# Altium PCB Car_wash_machine.PcbDoc (part 4 of 6)
Units mm, origin at the board's own origin, x right, y up, seen from the top; angles counter-clockwise.
Board outline 229.74 x 149.86 mm, 2 copper layers (Top Layer, Bottom Layer); 256 components, 170 nets, 868 pads, 731 vias.
Unrouted connection lines stored in the file: 362.
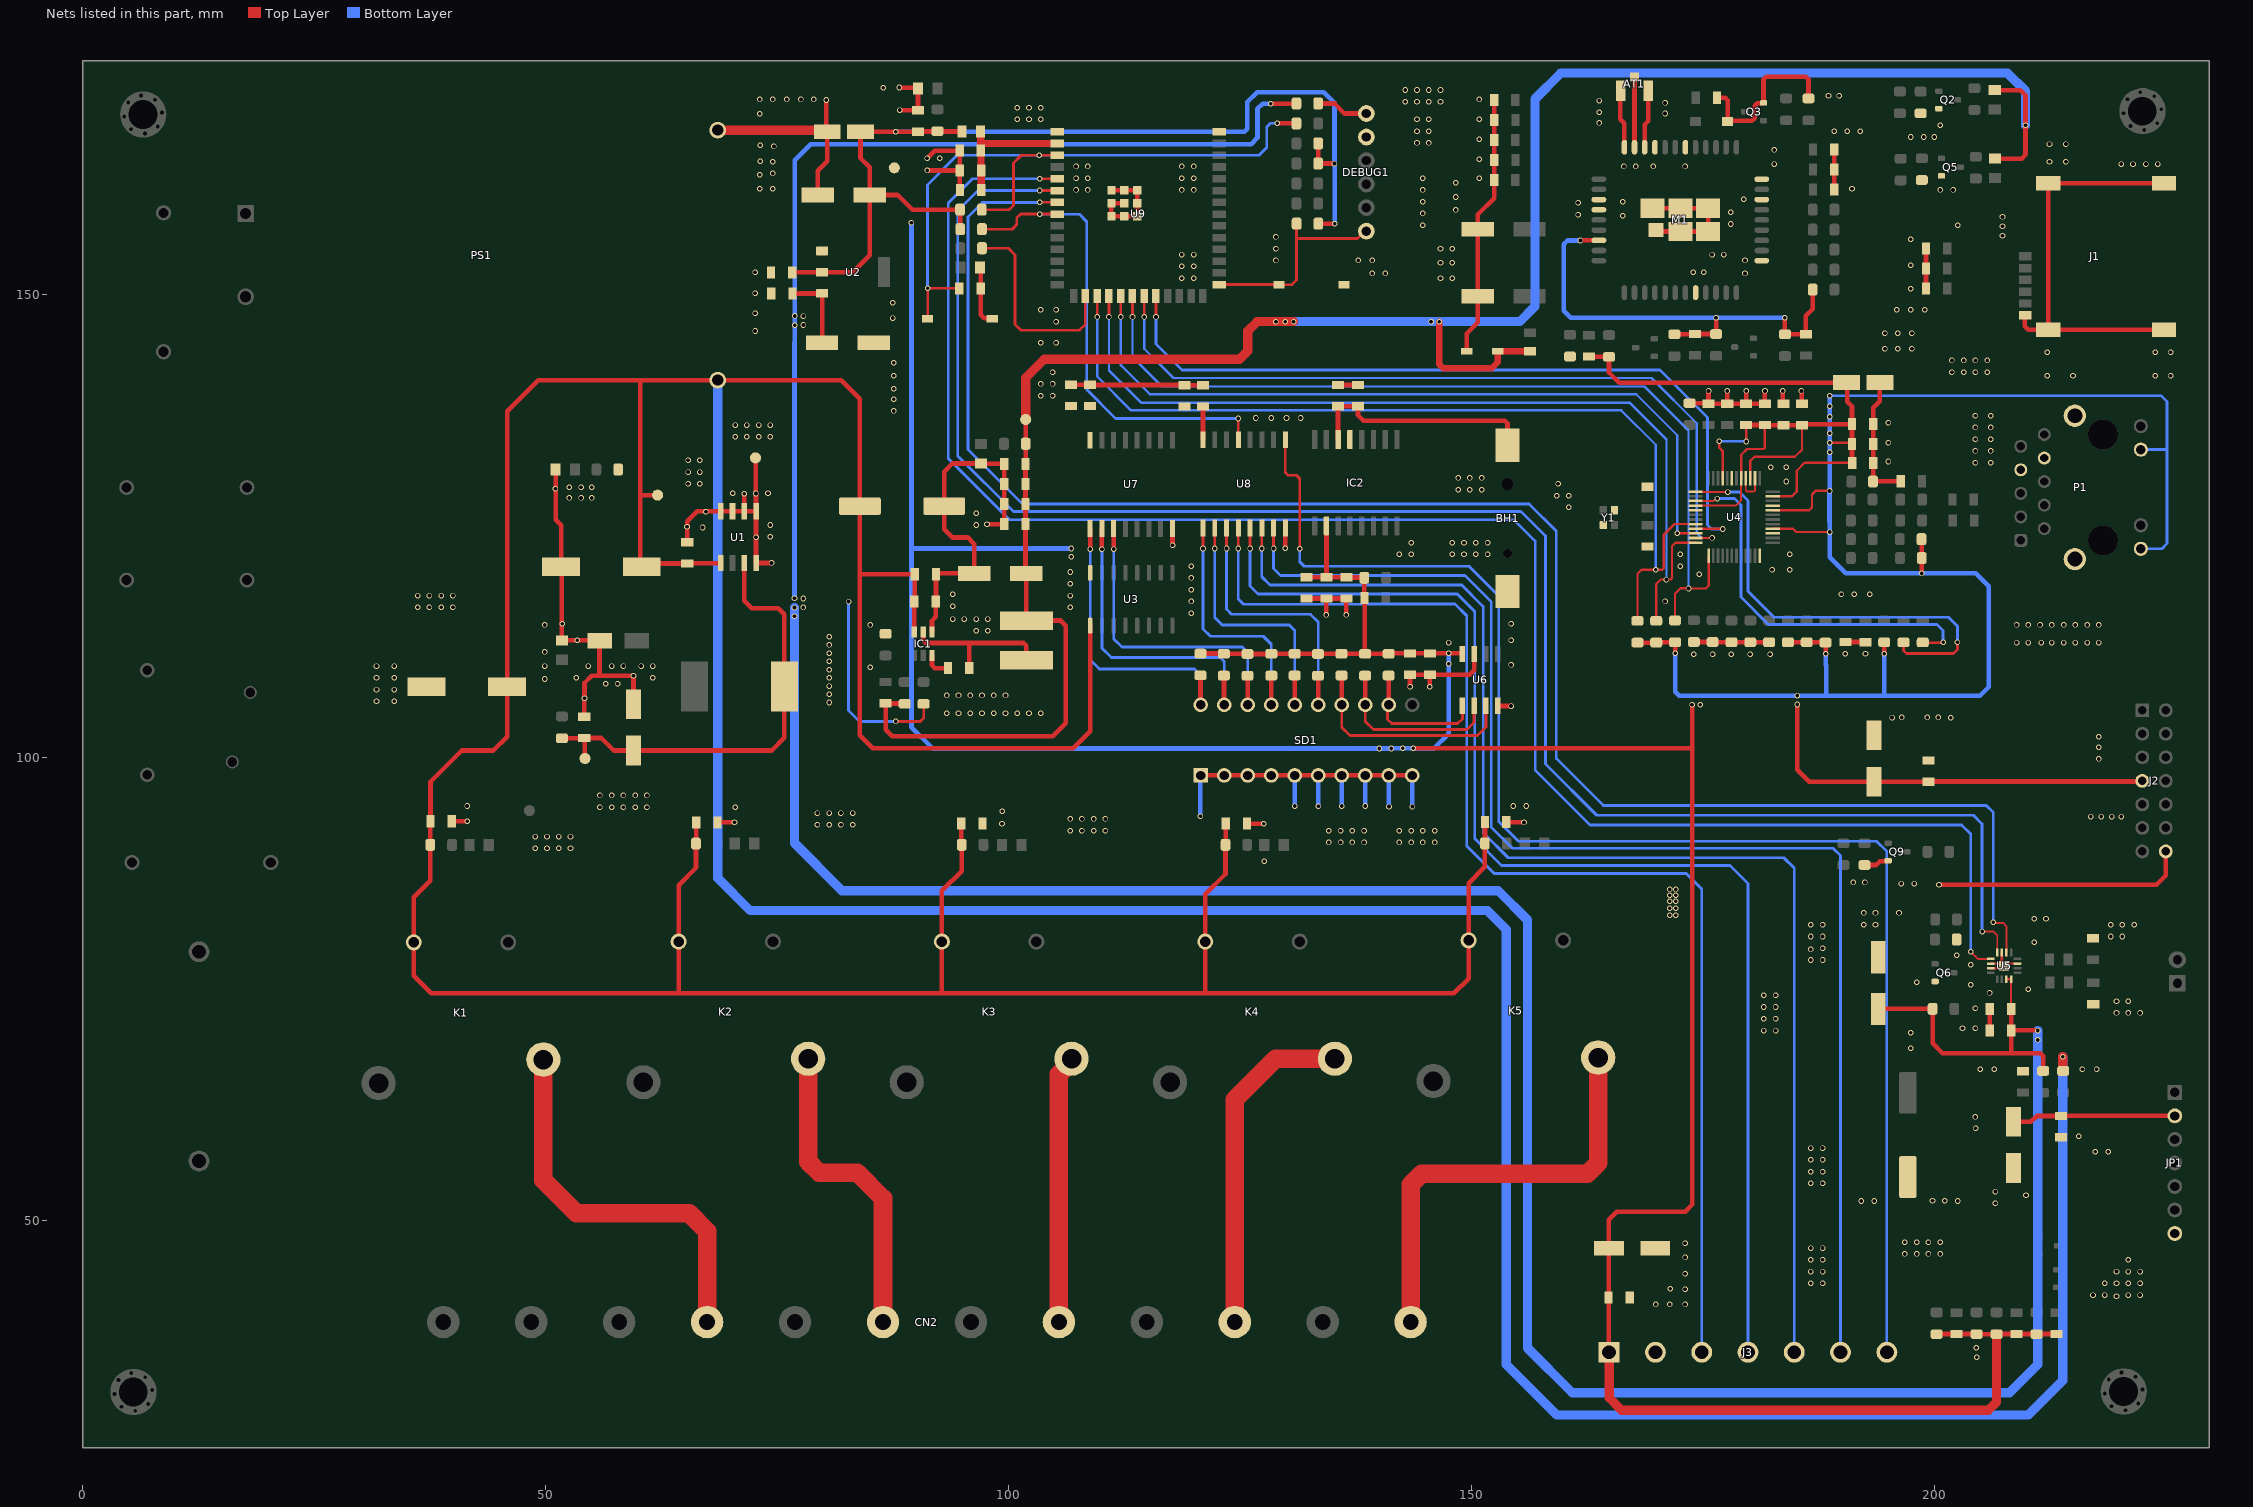
[diagram p2: the nets of this part, all layers, seen from the top]

## Part data (continued)
Q6: library part "TRANS-BJT_SMD; NPN 25V 1.5A SOT-23-3; SS8050-G", "Trans Gp Bjt NPN 25V 1.5A 300MW 3-PIN SOT-23 T/r", Case/Package=TO-236-3, Collector Base Voltage (VCBO)=40V, Collector Emitter Breakdown Voltage=25V, Collector Emitter Saturation Voltage=500mV, Collector-emitter Voltage-Max=400mV, Emitter Base Voltage (VEBO)=5V, Manufacturer Cross=Comchip, Manufacturer Part Number=SS8050-G, Max Collector Current=1.5A, Max Operating Temperature=150°C, Max Power Dissipation=300mW, Supplier Part Number 1=641-1790-1-ND, Transition Frequency=100MHz, Category=Transistors, ComponentLink1Description="http://www.comchiptech.com/admin/files/product/SS8050-G RevA181526.pdf?src-supplier=Digikey", ComponentLink1URL="http://www.comchiptech.com/admin/files/product/SS8050-G RevA181526.pdf?src-supplier=Digikey", ComponentLink2Description="Link Viet Nam", ComponentLink2URL=https://linhkien.cxtvn.com/6446-mmss8050-l-tp-transistor-npn-25v-15a-sot-23.html, ComponentLink3Description="Link Original", ComponentLink3URL=https://www.digikey.com/en/products/detail/comchip-technology/SS8050-G/6138901, ComponentLink4Description="Link Cross", ComponentLink4URL=https://www.lcsc.com/product-detail/Bipolar-BJT_Comchip-SS8050-G_C3199946.html?s_z=n_SS8050-G, Height=1.15mm, hFE Min=200, LIBRARY MADE BY="MR. XUAN SIEU", Max Breakdown Voltage=25V, Mount="Surface Mount", Number of Elements=1, Packaging="Cut Tape", Power Dissipation=300mW, Pricing 1="1=0.24, 10=0.148, 100=0.0921, 500=0.06754, 1000=0.05958 (USD)", RoHS=Yes, RoHS Compliant=Yes, Series=-, Stock 1=130674, Supplier 1=Digikey
Q9: library part "MOSFET_SMD; N-CH 20V 2.8A SOT23; DMG2302UKQ-7", "Trans MOSFET N-CH 20V 2.8A Automotive AEC-Q101 3-Pin SOT-23 T/R", Case/Package=SOT-23, Continuous Drain Current (ID)=2.8A, Drain to Source Voltage (Vdss)=20V, Input Capacitance=130pF, Manufacturer Cross=Diodes, Manufacturer Part Number=DMG2302UKQ-7, Max Operating Temperature=150°C, Max Power Dissipation=660mW, Min Operating Temperature=-55°C, Supplier Part Number 1=31-DMG2302UKQ-7CT-ND, Category=MOSFETs, ComponentLink1Description=https://datasheet.octopart.com/DMG2302UKQ-7-Diodes-Inc.-datasheet-149521367.pdf?src-supplier=Future+Electronics, ComponentLink1URL=https://datasheet.octopart.com/DMG2302UKQ-7-Diodes-Inc.-datasheet-149521367.pdf?src-supplier=Future+Electronics, ComponentLink2Description="Link Original", ComponentLink2URL=https://www.digikey.com/en/products/detail/diodes-incorporated/DMG2302UKQ-7/9769911, ComponentLink3Description="Link Cross", ComponentLink3URL=https://www.lcsc.com/product-detail/MOSFETs_Diodes-Incorporated-DMG2302UKQ-7_C5224573.html?s_z=n_DMG2302UKQ-7, ComponentLink4Description="Link Viet Nam", ComponentLink4URL=https://linhkien.cxtvn.com/6659-ln2302lt1g-mosfet-n-ch-20v-23a-sot-23-3.html, LIBRARY MADE BY="MR. XUAN SIEU", Mount="Surface Mount", Packaging="Tape and Reel", Pricing 1="1=0.23, 10=0.169, 100=0.1571, 500=0.1337 (USD)", Rds On Max=90mR, RoHS=Yes, Stock 1=513246, Supplier 1=Digikey
R1 R45 R49 R50 R53 R54 R56 R79: library part "RES_SMD; 1K, 1%, 0805, 1/8W", "1K / SIMPLE SWITCHER® 4.5V to 40V, 3A Low Component Count Step-Down Regulator 5-DDPAK/TO-263", Manufacturer Cross="Stackpole Electronics", Manufacturer Part Number=RNCP0805FTD1K00, Supplier Part Number 1=RNCP0805FTD1K00CT-ND, Category="Chip SMD Resistors", ComponentLink1Description=http://www.seielect.com/Catalog/SEI-rncp.pdf?src-supplier=Future+Electronics, ComponentLink1URL=http://www.seielect.com/Catalog/SEI-rncp.pdf?src-supplier=Future+Electronics, ComponentLink2Description=https://www.seielect.com/catalog/SEI-Packaging.pdf?src-supplier=Digikey, ComponentLink2URL=https://www.seielect.com/catalog/SEI-Packaging.pdf?src-supplier=Digikey, ComponentLink3Description=https://www.seielect.com/Catalog/SEI-rncp.pdf?src-supplier=Digikey, ComponentLink3URL=https://www.seielect.com/Catalog/SEI-rncp.pdf?src-supplier=Digikey, ComponentLink4Description="Link Original", ComponentLink4URL=https://www.digikey.com/en/products/detail/stackpole-electronics-inc/RNCP0805FTD1K00/2240229, ComponentLink5Description="Link Cross", ComponentLink5URL=https://www.lcsc.com/product-detail/Chip-Resistor-Surface-Mount_SEI-Stackpole-Elec-RNCP0805FTD1K00_C2441430.html?s_z=n_RNCP0805FTD1K00, ComponentLink6Description="Link Viet Nam", ComponentLink6URL=https://linhkien.cxtvn.com/2346-dien-tro-0805-1-thong-so-tu-1k-den-91k.html, LIBRARY MADE BY="MR. XUAN SIEU", Pricing 1="1=0.1, 10=0.015, 50=0.013, 100=0.0114, 500=0.01006, 5000=0.00916, 10000=0.00844, 15000=0.00807, 25000=0.00749, 35000=0.00693, 50000=0.00637, 125000=0.0063 (USD)", RoHS=Yes, Stock 1=269005, Supplier 1=Digikey
R2 R14 R15 R35 R41 R42 R43 R47 R59 R60 R63 R64 R67 R68: library part "RES_SMD; 4.7K, 1%, 0805, 1/8W", "Res Thick Film 0805 4.7K Ohm 1% 1/8W ±100ppm/°C Molded SMD Paper T/R", Manufacturer Cross=Vishay, Manufacturer Part Number=CRCW08054K70FKEAC, Supplier Part Number 1=541-4131-1-ND, Voltage Rating=150V, Category="Chip SMD Resistors", ComponentLink1Description=http://www.vishay.com/docs/28773/crcwce3.pdf?src-supplier=Digikey, ComponentLink1URL=http://www.vishay.com/docs/28773/crcwce3.pdf?src-supplier=Digikey, ComponentLink2Description=https://datasheet.octopart.com/CRCW08054K70FKEAC-Vishay-datasheet-100063072.pdf?src-supplier=Future+Electronics, ComponentLink2URL=https://datasheet.octopart.com/CRCW08054K70FKEAC-Vishay-datasheet-100063072.pdf?src-supplier=Future+Electronics, ComponentLink3Description="Link Original", ComponentLink3URL=https://www.digikey.com/en/products/detail/vishay-dale/CRCW08054K70FKEAC/7928553, ComponentLink4Description="Link Cross", ComponentLink4URL=https://www.lcsc.com/product-detail/Chip-Resistor-Surface-Mount_Vishay-Intertech-CRCW08054K70FKEAC_C844630.html?s_z=n_CRCW08054K70FKEAC, ComponentLink5Description="Link Viet Nam", ComponentLink5URL=https://linhkien.cxtvn.com/11332-dien-tro-0805-1-thong-so-tu-1k-den-91k.html, Height=600um, Lead Free=5697LeadFree, LIBRARY MADE BY="MR. XUAN SIEU", Pricing 1="1=0.1, 10=0.041, 100=0.0208, 1000=0.01059, 2500=0.00988, 5000=0.00661, 10000=0.00546, 15000=0.00542, 25000=0.00537, 35000=0.00535, 50000=0.00532, 125000=0.00526, 250000=0.00523, 500000=0.00519 (USD)", RoHS=Yes, Stock 1=866093, Supplier 1=Digikey
R3 R52: library part "RES_SMD; 100K, 1%, 0805, 1/8W", "SMD Chip Resistor, 100 kOhm, ï¿½ 1%, 125 mW, 0805 [2012 Metric], Thick Film, General Purpose", Case Code (Imperial)=0805, Case Code (Metric)=2012, Manufacturer Cross=Yageo, Manufacturer Part Number=RC0805FR-07100KL, Max Operating Temperature=155°C, Max Power Dissipation=125mW, Min Operating Temperature=-55°C, Package Quantity=1, Resistance=100kR, Resistance Tolerance=1%, Resistor Type="Thick Film", Supplier Part Number 1=311-100KCRCT-ND, Temperature Coefficient=100ppm/°C, Voltage Rating=150V, Case/Package=0805, Category="Chip SMD Resistors", ComponentLink1Description=https://datasheet.ciiva.com/11808/0900766b8106beab-11808858.pdf?src-supplier=Rs, ComponentLink1URL=https://datasheet.ciiva.com/11808/0900766b8106beab-11808858.pdf?src-supplier=Rs, ComponentLink2Description=https://datasheet.ciiva.com/7941/1686128-7941677.pdf?src-supplier=Element14, ComponentLink2URL=https://datasheet.ciiva.com/7941/1686128-7941677.pdf?src-supplier=Element14, ComponentLink3Description=https://datasheet.ciiva.com/7660/38627-7660796.pdf?src-supplier=Element14, ComponentLink3URL=https://datasheet.ciiva.com/7660/38627-7660796.pdf?src-supplier=Element14, ComponentLink4Description=https://datasheet.ciiva.com/22747/444164-22747534.pdf?src-supplier=Element14, ComponentLink4URL=https://datasheet.ciiva.com/22747/444164-22747534.pdf?src-supplier=Element14, ComponentLink5Description=https://datasheet.ciiva.com/2457/pyu-r-int-thick-7-2457018.pdf?src-supplier=Digikey, ComponentLink5URL=https://datasheet.ciiva.com/2457/pyu-r-int-thick-7-2457018.pdf?src-supplier=Digikey, ComponentLink6Description=https://datasheet.ciiva.com/2457/pyu-r-int-thick-7-2457019.pdf?src-supplier=Digikey, ComponentLink6URL=https://datasheet.ciiva.com/2457/pyu-r-int-thick-7-2457019.pdf?src-supplier=Digikey, ComponentLink7Description=https://datasheet.ciiva.com/2457/pyu-r-int-thick-7-2457017.pdf?src-supplier=Digikey, ComponentLink7URL=https://datasheet.ciiva.com/2457/pyu-r-int-thick-7-2457017.pdf?src-supplier=Digikey, ComponentLink8Description=https://datasheet.ciiva.com/12667/rc0805-12667001.pdf?src-supplier=Mouser, ComponentLink8URL=https://datasheet.ciiva.com/12667/rc0805-12667001.pdf?src-supplier=Mouser, ComponentLink9Description=https://datasheet.ciiva.com/7941/1697719-7941676.pdf?src-supplier=Element14, ComponentLink9URL=https://datasheet.ciiva.com/7941/1697719-7941676.pdf?src-supplier=Element14, ComponentLink10Description=https://datasheet.ciiva.com/7941/1697719-7941678.pdf?src-supplier=Element14, ComponentLink10URL=https://datasheet.ciiva.com/7941/1697719-7941678.pdf?src-supplier=Element14, ComponentLink11Description=https://datasheet.ciiva.com/16747/rc0805-16747226.pdf?src-supplier=Future+Electronics, ComponentLink11URL=https://datasheet.ciiva.com/16747/rc0805-16747226.pdf?src-supplier=Future+Electronics, ComponentLink12Description="Link Original", ComponentLink12URL=https://www.digikey.com/en/products/detail/yageo/RC0805FR-07100KL/727544, ComponentLink13Description="Link Cross", ComponentLink13URL=https://www.lcsc.com/product-detail/Chip-Resistor-Surface-Mount_YAGEO-RC0805FR-07100KL_C96346.html?s_z=n_RC0805FR-07100KL, ComponentLink14Description="Link Viet Nam", ComponentLink14URL=https://linhkien.cxtvn.com/10639-dien-tro-0805-1-thong-so-tu-100k-den-910k.html, Construction=Rectangular, Depth=1.25mm, Features="Moisture Resistant", Height=0.024inch, Lead Free=5697LeadFree, Lead Pitch=0.4mm, Length=0.079inch, LIBRARY MADE BY="MR. XUAN SIEU", Military Standard=Not, Number of Pins=2, Number of Terminations=2, Packaging="Tape and Reel", Power Rating=125mW, Pricing 1="1=0.1, 10=0.014, 100=0.0112, 1000=0.00918 (USD)", Reach SVHC Compliant=Unknown, RoHS=Yes, RoHS Compliant=Yes, Series=RC, Size Code=0805, Stock 1=541448, Supplier 1=Digikey, Technology="THICK FILM", Termination=SMD/SMT, Tolerance=1%, Voltage Rating (AC)=150V, Voltage Rating (DC)=150V, Width=0.049inch
R4 R6 R28 R34 R58 R78: library part "RES_SMD; 330R, 1%, 0805, 1/8W", "Res Thick Film 0805 330 Ohm 1% 0.125W ±100ppm/°C Molded SMD Paper T/R", Manufacturer="Stackpole Electronics", Manufacturer Part Number=RMCF0805FT330R, Supplier Part Number 1=RMCF0805FT330RCT-ND, Category="Chip SMD Resistors", ComponentLink1Description=http://components.arrow.com/part/dataview/40963487S9848862N1174?src-supplier=Arrow+Electronics, ComponentLink1URL=http://components.arrow.com/part/dataview/40963487S9848862N1174?src-supplier=Arrow+Electronics, ComponentLink2Description=https://datasheet.octopart.com/RMCF0805FT330R-Stackpole-Electronics-datasheet-12534581.pdf?src-supplier=Future+Electronics, ComponentLink2URL=https://datasheet.octopart.com/RMCF0805FT330R-Stackpole-Electronics-datasheet-12534581.pdf?src-supplier=Future+Electronics, ComponentLink3Description=https://www.verical.com/server-webapp/html/getDatasheet?partID=559884&src-supplier=Verical, ComponentLink3URL=https://www.verical.com/server-webapp/html/getDatasheet?partID=559884&src-supplier=Verical, ComponentLink4Description=https://www.seielect.com/Catalog/SEI-RMCF_RMCP.pdf?src-supplier=Digikey, ComponentLink4URL=https://www.seielect.com/Catalog/SEI-RMCF_RMCP.pdf?src-supplier=Digikey, ComponentLink5Description=https://www.seielect.com/catalog/SEI-RMCF_RMCP.pdf?src-supplier=Avnet, ComponentLink5URL=https://www.seielect.com/catalog/SEI-RMCF_RMCP.pdf?src-supplier=Avnet, ComponentLink6Description=https://www.seielect.com/catalog/SEI-Packaging.pdf?src-supplier=Digikey, ComponentLink6URL=https://www.seielect.com/catalog/SEI-Packaging.pdf?src-supplier=Digikey, LIBRARY MADE BY="MR. XUAN SIEU", LINK ORIGINAL=https://www.digikey.com/en/products/detail/stackpole-electronics-inc/RMCF0805FT330R/1760484?s=N4IgTCBcDaIEoFkDCAxADADjQVhQFQGYC04QBdAXyA, LINK VIET NAM=https://linhkien.cxtvn.com/2743-dien-tro-330r-0805-1-50c.html, Pricing 1="1=0.1, 10=0.02, 50=0.0124, 100=0.0103, 500=0.007, 1000=0.00601 (USD)", RoHS=Yes, Stock 1=325760, Supplier 1=Digikey
R7 R8 R9 R11 R13 R16 R18 R19 R24 R26 R30 R32 R37 R51 R57 R65 R66 R69 R70 R71 R72 R73 R74 R75 R76 R77 R80 R83: library part "RES_SMD; 10K, 1%, 0805, 1/8W", "SMD Chip Resistor, 10 kOhm, ± 1%, 125 mW, 0805 [2012 Metric], Thick Film, General Purpose", Manufacturer Cross="Stackpole Electronics", Manufacturer Part Number=RMCF0805FT10K0, Supplier Part Number 1=RMCF0805FT10K0CT-ND, Voltage Rating=150V, Category="Chip SMD Resistors", ComponentLink1Description=https://datasheet.ciiva.com/15193/getdatasheetpartid-362046-15193525.pdf?src-supplier=Verical, ComponentLink1URL=https://datasheet.ciiva.com/15193/getdatasheetpartid-362046-15193525.pdf?src-supplier=Verical, ComponentLink2Description="Link Original", ComponentLink2URL=https://www.digikey.com/en/products/detail/stackpole-electronics-inc/RMCF0805FT10K0/1760676, ComponentLink3Description="Link Cross", ComponentLink3URL=https://www.lcsc.com/product-detail/Chip-Resistor-Surface-Mount_SEI-Stackpole-Elec-RMCF0805FT10K0_C237755.html, ComponentLink4Description="Link Viet Nam", ComponentLink4URL=https://linhkien.cxt.vn/8484-rc0805fr-0710kl-res-10k-ohm-1-18w-0805.html, Lead Free=5697LeadFree, LIBRARY MADE BY="MR. XUAN SIEU", Pricing 1="1=0.1, 10=0.02, 50=0.0124, 100=0.0103, 500=0.007, 1000=0.00601 (USD)", RoHS=Yes, Stock 1=1959497, Supplier 1=Digikey
R10 R12 R17 R20: library part "RES_SMD; 33R, 1%, 0805, 1/8W_1", "SMD Chip Resistor, 33 Ohm, ± 1%, 125 mW, 0805 [2012 Metric], Thick Film, General Purpose", Manufacturer Cross=Yageo, Manufacturer Part Number=RC0805FR-0722RL, Supplier Part Number 1=311-22.0CRCT-ND, Voltage Rating (AC)=150V, Category="Chip SMD Resistors", ComponentLink1Description=https://datasheet.ciiva.com/11819/0900766b8106beab-11819837.pdf?src-supplier=Rs, ComponentLink1URL=https://datasheet.ciiva.com/11819/0900766b8106beab-11819837.pdf?src-supplier=Rs, ComponentLink2Description=https://datasheet.ciiva.com/2457/pyu-r-int-thick-7-2457045.pdf?src-supplier=Digikey, ComponentLink2URL=https://datasheet.ciiva.com/2457/pyu-r-int-thick-7-2457045.pdf?src-supplier=Digikey, ComponentLink3Description=https://datasheet.ciiva.com/2457/pyu-r-int-thick-7-2457046.pdf?src-supplier=Digikey, ComponentLink3URL=https://datasheet.ciiva.com/2457/pyu-r-int-thick-7-2457046.pdf?src-supplier=Digikey, ComponentLink4Description=https://datasheet.ciiva.com/12667/rc0805-12667371.pdf?src-supplier=Mouser, ComponentLink4URL=https://datasheet.ciiva.com/12667/rc0805-12667371.pdf?src-supplier=Mouser, ComponentLink5Description=https://datasheet.ciiva.com/2457/pyu-r-int-thick-7-2457044.pdf?src-supplier=Digikey, ComponentLink5URL=https://datasheet.ciiva.com/2457/pyu-r-int-thick-7-2457044.pdf?src-supplier=Digikey, ComponentLink6Description=https://datasheet.ciiva.com/46447/444164-46447574.pdf?src-supplier=Element14, ComponentLink6URL=https://datasheet.ciiva.com/46447/444164-46447574.pdf?src-supplier=Element14, ComponentLink7Description="Link Original", ComponentLink7URL=https://www.digikey.com/en/products/detail/yageo/RC0805FR-0722RL/727735, ComponentLink8Description="Link Cross", ComponentLink8URL=https://www.lcsc.com/product-detail/Chip-Resistor-Surface-Mount_YAGEO-RC0805FR-0722RL_C107702.html?s_z=n_RC0805FR-0722RL, ComponentLink9Description="Link Viet Nam", ComponentLink9URL=https://linhkien.cxtvn.com/10363-dien-tro-0805-1-thong-so-tu-0r-den-910r.html, Lead Free=5697LeadFree, LIBRARY MADE BY="MR. XUAN SIEU", Pricing 1="1=0.1, 10=0.012, 100=0.0112, 1000=0.00918, 5000=0.00408, 10000=0.00357, 15000=0.00355, 500000=0.00338 (USD)", RoHS=Yes, Stock 1=280945, Supplier 1=Digikey
R21 R23 R39 R40: library part "RES_SMD; 49.9R, 1%, 0805, 1/8W_1_1", "SMD Chip Resistor, 49.9 Ohm, ± 1%, 125 mW, 0805 [2012 Metric], Thick Film, General Purpose", Manufacturer Cross=Yageo, Manufacturer Part Number=RC0805FR-0722RL, Supplier Part Number 1=311-22.0CRCT-ND, Voltage Rating (AC)=150V, Category="Chip SMD Resistors", ComponentLink1Description=https://datasheet.ciiva.com/11819/0900766b8106beab-11819837.pdf?src-supplier=Rs, ComponentLink1URL=https://datasheet.ciiva.com/11819/0900766b8106beab-11819837.pdf?src-supplier=Rs, ComponentLink2Description=https://datasheet.ciiva.com/2457/pyu-r-int-thick-7-2457045.pdf?src-supplier=Digikey, ComponentLink2URL=https://datasheet.ciiva.com/2457/pyu-r-int-thick-7-2457045.pdf?src-supplier=Digikey, ComponentLink3Description=https://datasheet.ciiva.com/2457/pyu-r-int-thick-7-2457046.pdf?src-supplier=Digikey, ComponentLink3URL=https://datasheet.ciiva.com/2457/pyu-r-int-thick-7-2457046.pdf?src-supplier=Digikey, ComponentLink4Description=https://datasheet.ciiva.com/12667/rc0805-12667371.pdf?src-supplier=Mouser, ComponentLink4URL=https://datasheet.ciiva.com/12667/rc0805-12667371.pdf?src-supplier=Mouser, ComponentLink5Description=https://datasheet.ciiva.com/2457/pyu-r-int-thick-7-2457044.pdf?src-supplier=Digikey, ComponentLink5URL=https://datasheet.ciiva.com/2457/pyu-r-int-thick-7-2457044.pdf?src-supplier=Digikey, ComponentLink6Description=https://datasheet.ciiva.com/46447/444164-46447574.pdf?src-supplier=Element14, ComponentLink6URL=https://datasheet.ciiva.com/46447/444164-46447574.pdf?src-supplier=Element14, ComponentLink7Description="Link Original", ComponentLink7URL=https://www.digikey.com/en/products/detail/yageo/RC0805FR-0722RL/727735, ComponentLink8Description="Link Cross", ComponentLink8URL=https://www.lcsc.com/product-detail/Chip-Resistor-Surface-Mount_YAGEO-RC0805FR-0722RL_C107702.html?s_z=n_RC0805FR-0722RL, ComponentLink9Description="Link Viet Nam", ComponentLink9URL=https://linhkien.cxtvn.com/10363-dien-tro-0805-1-thong-so-tu-0r-den-910r.html, Lead Free=5697LeadFree, LIBRARY MADE BY="MR. XUAN SIEU", Pricing 1="1=0.1, 10=0.012, 100=0.0112, 1000=0.00918, 5000=0.00408, 10000=0.00357, 15000=0.00355, 500000=0.00338 (USD)", RoHS=Yes, Stock 1=280945, Supplier 1=Digikey
R22: library part "RES_SMD; 10R, 1%, 0805, 1/8W_1_1", "SMD Chip Resistor, 10 Ohm, ± 1%, 125 mW, 0805 [2012 Metric], Thick Film, General Purpose", Manufacturer Cross=Yageo, Manufacturer Part Number=RC0805FR-0722RL, Supplier Part Number 1=311-22.0CRCT-ND, Voltage Rating (AC)=150V, Category="Chip SMD Resistors", ComponentLink1Description=https://datasheet.ciiva.com/11819/0900766b8106beab-11819837.pdf?src-supplier=Rs, ComponentLink1URL=https://datasheet.ciiva.com/11819/0900766b8106beab-11819837.pdf?src-supplier=Rs, ComponentLink2Description=https://datasheet.ciiva.com/2457/pyu-r-int-thick-7-2457045.pdf?src-supplier=Digikey, ComponentLink2URL=https://datasheet.ciiva.com/2457/pyu-r-int-thick-7-2457045.pdf?src-supplier=Digikey, ComponentLink3Description=https://datasheet.ciiva.com/2457/pyu-r-int-thick-7-2457046.pdf?src-supplier=Digikey, ComponentLink3URL=https://datasheet.ciiva.com/2457/pyu-r-int-thick-7-2457046.pdf?src-supplier=Digikey, ComponentLink4Description=https://datasheet.ciiva.com/12667/rc0805-12667371.pdf?src-supplier=Mouser, ComponentLink4URL=https://datasheet.ciiva.com/12667/rc0805-12667371.pdf?src-supplier=Mouser, ComponentLink5Description=https://datasheet.ciiva.com/2457/pyu-r-int-thick-7-2457044.pdf?src-supplier=Digikey, ComponentLink5URL=https://datasheet.ciiva.com/2457/pyu-r-int-thick-7-2457044.pdf?src-supplier=Digikey, ComponentLink6Description=https://datasheet.ciiva.com/46447/444164-46447574.pdf?src-supplier=Element14, ComponentLink6URL=https://datasheet.ciiva.com/46447/444164-46447574.pdf?src-supplier=Element14, ComponentLink7Description="Link Original", ComponentLink7URL=https://www.digikey.com/en/products/detail/yageo/RC0805FR-0722RL/727735, ComponentLink8Description="Link Cross", ComponentLink8URL=https://www.lcsc.com/product-detail/Chip-Resistor-Surface-Mount_YAGEO-RC0805FR-0722RL_C107702.html?s_z=n_RC0805FR-0722RL, ComponentLink9Description="Link Viet Nam", ComponentLink9URL=https://linhkien.cxtvn.com/10363-dien-tro-0805-1-thong-so-tu-0r-den-910r.html, Lead Free=5697LeadFree, LIBRARY MADE BY="MR. XUAN SIEU", Pricing 1="1=0.1, 10=0.012, 100=0.0112, 1000=0.00918, 5000=0.00408, 10000=0.00357, 15000=0.00355, 500000=0.00338 (USD)", RoHS=Yes, Stock 1=280945, Supplier 1=Digikey
R25 R29 R33 R36: library part "RES_SMD; 22R, 1%, 0805, 1/8W", "SMD Chip Resistor, 22 Ohm, ± 1%, 125 mW, 0805 [2012 Metric], Thick Film, General Purpose", Manufacturer Cross=Yageo, Manufacturer Part Number=RC0805FR-0722RL, Supplier Part Number 1=311-22.0CRCT-ND, Voltage Rating (AC)=150V, Category="Chip SMD Resistors", ComponentLink1Description=https://datasheet.ciiva.com/11819/0900766b8106beab-11819837.pdf?src-supplier=Rs, ComponentLink1URL=https://datasheet.ciiva.com/11819/0900766b8106beab-11819837.pdf?src-supplier=Rs, ComponentLink2Description=https://datasheet.ciiva.com/2457/pyu-r-int-thick-7-2457045.pdf?src-supplier=Digikey, ComponentLink2URL=https://datasheet.ciiva.com/2457/pyu-r-int-thick-7-2457045.pdf?src-supplier=Digikey, ComponentLink3Description=https://datasheet.ciiva.com/2457/pyu-r-int-thick-7-2457046.pdf?src-supplier=Digikey, ComponentLink3URL=https://datasheet.ciiva.com/2457/pyu-r-int-thick-7-2457046.pdf?src-supplier=Digikey, ComponentLink4Description=https://datasheet.ciiva.com/12667/rc0805-12667371.pdf?src-supplier=Mouser, ComponentLink4URL=https://datasheet.ciiva.com/12667/rc0805-12667371.pdf?src-supplier=Mouser, ComponentLink5Description=https://datasheet.ciiva.com/2457/pyu-r-int-thick-7-2457044.pdf?src-supplier=Digikey, ComponentLink5URL=https://datasheet.ciiva.com/2457/pyu-r-int-thick-7-2457044.pdf?src-supplier=Digikey, ComponentLink6Description=https://datasheet.ciiva.com/46447/444164-46447574.pdf?src-supplier=Element14, ComponentLink6URL=https://datasheet.ciiva.com/46447/444164-46447574.pdf?src-supplier=Element14, ComponentLink7Description="Link Original", ComponentLink7URL=https://www.digikey.com/en/products/detail/yageo/RC0805FR-0722RL/727735, ComponentLink8Description="Link Cross", ComponentLink8URL=https://www.lcsc.com/product-detail/Chip-Resistor-Surface-Mount_YAGEO-RC0805FR-0722RL_C107702.html?s_z=n_RC0805FR-0722RL, ComponentLink9Description="Link Viet Nam", ComponentLink9URL=https://linhkien.cxtvn.com/10363-dien-tro-0805-1-thong-so-tu-0r-den-910r.html, Lead Free=5697LeadFree, LIBRARY MADE BY="MR. XUAN SIEU", Pricing 1="1=0.1, 10=0.012, 100=0.0112, 1000=0.00918, 5000=0.00408, 10000=0.00357, 15000=0.00355, 500000=0.00338 (USD)", RoHS=Yes, Stock 1=280945, Supplier 1=Digikey
R27: library part "RES_SMD; 12.1K, 1%, 0805, 1/8W_1", "SMD Chip Resistor, 12.1 kOhm, ± 1%, 125 mW, 0805 [2012 Metric], Thick Film, General Purpose", Manufacturer Cross="Stackpole Electronics", Manufacturer Part Number=RMCF0805FT10K0, Supplier Part Number 1=RMCF0805FT10K0CT-ND, Voltage Rating=150V, Category="Chip SMD Resistors", ComponentLink1Description=https://datasheet.ciiva.com/15193/getdatasheetpartid-362046-15193525.pdf?src-supplier=Verical, ComponentLink1URL=https://datasheet.ciiva.com/15193/getdatasheetpartid-362046-15193525.pdf?src-supplier=Verical, ComponentLink2Description="Link Original", ComponentLink2URL=https://www.digikey.com/en/products/detail/stackpole-electronics-inc/RMCF0805FT10K0/1760676, ComponentLink3Description="Link Cross", ComponentLink3URL=https://www.lcsc.com/product-detail/Chip-Resistor-Surface-Mount_SEI-Stackpole-Elec-RMCF0805FT10K0_C237755.html, ComponentLink4Description="Link Viet Nam", ComponentLink4URL=https://linhkien.cxt.vn/8484-rc0805fr-0710kl-res-10k-ohm-1-18w-0805.html, Lead Free=5697LeadFree, LIBRARY MADE BY="MR. XUAN SIEU", Pricing 1="1=0.1, 10=0.02, 50=0.0124, 100=0.0103, 500=0.007, 1000=0.00601 (USD)", RoHS=Yes, Stock 1=1959497, Supplier 1=Digikey
R31 R46: library part "RES_SMD; 2.2K, 1%, 0805, 1/8W", "Res Thick Film 0805 2.2K Ohm 1% 0.125W(1/8W) ±100ppm/C Pad SMD T/R", Case Code (Imperial)=0805, Case Code (Metric)=2012, Manufacturer Cross="TE Connectivity", Manufacturer Part Number=CRG0805F2K2, Max Operating Temperature=125°C, Max Power Dissipation=125mW, Min Operating Temperature=-55°C, Number of Resistors=1, Operating Supply Voltage=150V, Package Quantity=5000, Resistance=2.2kR, Resistor Type="Thick Film", Supplier Part Number 1=A106060CT-ND, Temperature Coefficient=100ppm/°C, Tolerance=1%, Case/Package=0805, Category="Chip SMD Resistors", ComponentLink1Description=https://datasheet.ciiva.com/11809/0900766b800a696e-11809606.pdf?src-supplier=Rs, ComponentLink1URL=https://datasheet.ciiva.com/11809/0900766b800a696e-11809606.pdf?src-supplier=Rs, ComponentLink2Description=https://datasheet.ciiva.com/30142/eng-ds-1773204-e-30142790.pdf?src-supplier=Onlinecomponents.com, ComponentLink2URL=https://datasheet.ciiva.com/30142/eng-ds-1773204-e-30142790.pdf?src-supplier=Onlinecomponents.com, ComponentLink3Description=https://datasheet.ciiva.com/5547/eng-ds-1773204-g-5547934.pdf?src-supplier=Mouser, ComponentLink3URL=https://datasheet.ciiva.com/5547/eng-ds-1773204-g-5547934.pdf?src-supplier=Mouser, ComponentLink4Description="Link Original", ComponentLink4URL=https://www.digikey.com/en/products/detail/te-connectivity-passive-product/CRG0805F2K2/2135487, ComponentLink5Description="Link Cross", ComponentLink5URL=https://www.lcsc.com/product-detail/Chip-Resistor-Surface-Mount_TE-Connectivity-CRG0805F2K2_C2073912.html?s_z=n_CRG0805F2K2, ComponentLink6Description="Link Viet Nam", ComponentLink6URL=https://linhkien.cxtvn.com/5089-dien-tro-0805-1-thong-so-tu-1k-den-91k.html, Depth=1.25mm, ELV=Compliant, Height=0.55mm, Length=2mm, LIBRARY MADE BY="MR. XUAN SIEU", Military Standard=Not, Mount="Surface Mount", Number of Terminations=2, Packaging="Tape and Reel", Power Rating=125mW, Pricing 1="1=0.1, 10=0.035, 100=0.0179, 1000=0.01031, 2500=0.00862 (USD)", RoHS=Yes, RoHS Compliant=Yes, Series=CRG, Stock 1=293904, Supplier 1=Digikey, Technology="THICK FILM", Termination=Solder, Voltage Rating=150V, Voltage Rating (DC)=150V, Weight=0.000194oz, Width=1.25mm
R55: library part "RES_SMD; 680K, 1%, 0805, 1/8W_1", "SMD Chip Resistor, 680kOhm, ï¿½ 1%, 125 mW, 0805 [2012 Metric], Thick Film, General Purpose", Case Code (Imperial)=0805, Case Code (Metric)=2012, Manufacturer Cross=Yageo, Manufacturer Part Number=RC0805FR-07100KL, Max Operating Temperature=155°C, Max Power Dissipation=125mW, Min Operating Temperature=-55°C, Package Quantity=1, Resistance=100kR, Resistance Tolerance=1%, Resistor Type="Thick Film", Supplier Part Number 1=311-100KCRCT-ND, Temperature Coefficient=100ppm/°C, Voltage Rating=150V, Case/Package=0805, Category="Chip SMD Resistors", ComponentLink1Description=https://datasheet.ciiva.com/11808/0900766b8106beab-11808858.pdf?src-supplier=Rs, ComponentLink1URL=https://datasheet.ciiva.com/11808/0900766b8106beab-11808858.pdf?src-supplier=Rs, ComponentLink2Description=https://datasheet.ciiva.com/7941/1686128-7941677.pdf?src-supplier=Element14, ComponentLink2URL=https://datasheet.ciiva.com/7941/1686128-7941677.pdf?src-supplier=Element14, ComponentLink3Description=https://datasheet.ciiva.com/7660/38627-7660796.pdf?src-supplier=Element14, ComponentLink3URL=https://datasheet.ciiva.com/7660/38627-7660796.pdf?src-supplier=Element14, ComponentLink4Description=https://datasheet.ciiva.com/22747/444164-22747534.pdf?src-supplier=Element14, ComponentLink4URL=https://datasheet.ciiva.com/22747/444164-22747534.pdf?src-supplier=Element14, ComponentLink5Description=https://datasheet.ciiva.com/2457/pyu-r-int-thick-7-2457018.pdf?src-supplier=Digikey, ComponentLink5URL=https://datasheet.ciiva.com/2457/pyu-r-int-thick-7-2457018.pdf?src-supplier=Digikey, ComponentLink6Description=https://datasheet.ciiva.com/2457/pyu-r-int-thick-7-2457019.pdf?src-supplier=Digikey, ComponentLink6URL=https://datasheet.ciiva.com/2457/pyu-r-int-thick-7-2457019.pdf?src-supplier=Digikey, ComponentLink7Description=https://datasheet.ciiva.com/2457/pyu-r-int-thick-7-2457017.pdf?src-supplier=Digikey, ComponentLink7URL=https://datasheet.ciiva.com/2457/pyu-r-int-thick-7-2457017.pdf?src-supplier=Digikey, ComponentLink8Description=https://datasheet.ciiva.com/12667/rc0805-12667001.pdf?src-supplier=Mouser, ComponentLink8URL=https://datasheet.ciiva.com/12667/rc0805-12667001.pdf?src-supplier=Mouser, ComponentLink9Description=https://datasheet.ciiva.com/7941/1697719-7941676.pdf?src-supplier=Element14, ComponentLink9URL=https://datasheet.ciiva.com/7941/1697719-7941676.pdf?src-supplier=Element14, ComponentLink10Description=https://datasheet.ciiva.com/7941/1697719-7941678.pdf?src-supplier=Element14, ComponentLink10URL=https://datasheet.ciiva.com/7941/1697719-7941678.pdf?src-supplier=Element14, ComponentLink11Description=https://datasheet.ciiva.com/16747/rc0805-16747226.pdf?src-supplier=Future+Electronics, ComponentLink11URL=https://datasheet.ciiva.com/16747/rc0805-16747226.pdf?src-supplier=Future+Electronics, ComponentLink12Description="Link Original", ComponentLink12URL=https://www.digikey.com/en/products/detail/yageo/RC0805FR-07100KL/727544, ComponentLink13Description="Link Cross", ComponentLink13URL=https://www.lcsc.com/product-detail/Chip-Resistor-Surface-Mount_YAGEO-RC0805FR-07100KL_C96346.html?s_z=n_RC0805FR-07100KL, ComponentLink14Description="Link Viet Nam", ComponentLink14URL=https://linhkien.cxtvn.com/10639-dien-tro-0805-1-thong-so-tu-100k-den-910k.html, Construction=Rectangular, Depth=1.25mm, Features="Moisture Resistant", Height=0.024inch, Lead Free=5697LeadFree, Lead Pitch=0.4mm, Length=0.079inch, LIBRARY MADE BY="MR. XUAN SIEU", Military Standard=Not, Number of Pins=2, Number of Terminations=2, Packaging="Tape and Reel", Power Rating=125mW, Pricing 1="1=0.1, 10=0.014, 100=0.0112, 1000=0.00918 (USD)", Reach SVHC Compliant=Unknown, RoHS=Yes, RoHS Compliant=Yes, Series=RC, Size Code=0805, Stock 1=541448, Supplier 1=Digikey, Technology="THICK FILM", Termination=SMD/SMT, Tolerance=1%, Voltage Rating (AC)=150V, Voltage Rating (DC)=150V, Width=0.049inch
SD1: library part SWDIP10, "DIP Switch, 10 Position, SPST"
U2: "1A LOW DROPOUT VOLTAGE REGULATOR", Package="SOT-223 Seeed Technology", Availability="Not in stock", Check_prices=https://www.snapeda.com/parts/AMS1117-5.0/ams/view-part/?ref=eda, MF=ams, MP=AMS1117-5.0, Price=None, SnapEDA_Link=https://www.snapeda.com/parts/AMS1117-5.0/ams/view-part/?ref=snap
U4: library part IC_W5500, "Hardwired TCP/IP embedded Ethernet control  48 Pin LQFP Lead-Free Package (7x7mm, 0.5mm pitch)", Manufacturer=WIZNET, Package="LQFP 48", Group="ICS INT", Part Type=EP, Supplier=MHT
U5: "Tiny, Low-Cost, PCM Class D Amplifier with Class AB Performance", Package="TQFN-16 Maxim", Check_prices=https://www.snapeda.com/parts/MAX98357AETE+T/Analog+Devices/view-part/?ref=eda, MF="Analog Devices", MP=MAX98357AETE+T, SnapEDA_Link=https://www.snapeda.com/parts/MAX98357AETE+T/Analog+Devices/view-part/?ref=snap
U6: "FRAM (Ferroelectric RAM) Memory IC 256Kb (32K x 8) IÂ²C 1 MHz 550 ns 8-SOP", Package="SOP-8 Fujitsu", Check_prices=https://www.snapeda.com/parts/MB85RC256VPF-G-JNERE2/Fujitsu/view-part/?ref=eda, MF="Fujitsu Electronics", MP=MB85RC256VPF-G-JNERE2, SnapEDA_Link=https://www.snapeda.com/parts/MB85RC256VPF-G-JNERE2/Fujitsu/view-part/?ref=snap
U7 U8: "I2C Bus IC Operating temperature: -40...+85 Â°C Power supply: 2.5...6 V Package: SO-16W", Package="SOIC-16 NXP Semiconductors", Check_prices=https://www.snapeda.com/parts/PCF8574AT/NXP+Semiconductors/view-part/?ref=eda, MF="NXP USA", MP=PCF8574AT, SnapEDA_Link=https://www.snapeda.com/parts/PCF8574AT/NXP+Semiconductors/view-part/?ref=snap
U9: library part MCU_SMD;ESP32-S3-WROOM-1(N16R8), "Bluetooth, WiFi 802.11b/g/n, Bluetooth v5.0 Transceiver Module 2.4GHz PCB Trace Surface Mount / HIGHEST_MODULE", Manufacturer="Espressif Systems", Supplier Part Number 1=5407-ESP32-S3-WROOM-1-N16R8CT-ND, Category=LDO, ComponentLink1Description=https://datasheet.octopart.com/ESP32-S3-WROOM-1-N16R8-Espressif-Systems-datasheet-188867343.pdf?src-supplier=TME, ComponentLink1URL=https://datasheet.octopart.com/ESP32-S3-WROOM-1-N16R8-Espressif-Systems-datasheet-188867343.pdf?src-supplier=TME, LIBRARY MADE BY="MR. XUAN SIEU", LINK ORIGINAL=https://www.digikey.com/en/products/detail/espressif-systems/ESP32-S3-WROOM-1-N16R8/16162642, LINK VIET NAM=https://epi-tech.com.vn/vi/featured_products/espressif-esp32-s3-wroom-1-n16r8-socs-wifi-bluetooth-modules-increase-data-processing-speed/, Manufacturer Part Number=ESP32-S3-WROOM-1(N16R8), Pricing 1="1=6.56, 10=5.683, 25=5.378, 100=4.9592, 250=4.7084, 650=4.46702, 1300=4.30394, 1950=4.21299 (USD)", RoHS=No, Stock 1=1451, Supplier 1=Digikey
Y1: library part "CRYSTAL 25MHz - 2016", "25MHz SMD Crystal Resonator 16pF 80Ω ±10ppm -40℃~+85℃ SMD2016-4P Crystals ROHS", Manufacturer="Seiko Epson", Manufacturer PN=Q22FA12800388, Package=SMD2016-4P, Group=CRYSTAL, Line Type=SMT, Link=https://lcsc.com/product-detail/Crystals_Seiko-Epson-Q22FA12800388_C255884.html, Mounting Type=SMD, Part Type=EP, Price=0.11, Supplier=MHT
SW1 SW2: Ma_Hang=MH001036, Ten="Nút Nhấn 2 Chân 3x6x2.5MM SMD"

## Via types
v1: diameter 0.6, hole 0.4, Top Layer to Bottom Layer, tented both sides, 730 vias
v2: diameter 0.6/0.6 (per signal layer), hole 0.4, Top Layer to Bottom Layer, tented both sides, 1 vias

## Nets (pads, with @x,y where several pads share a name; then routed paths per layer and width w, separated by ;. In a path a pad name is that pad's centre, name@x,y a point inside that pad or via, vN(x,y) a via of type N, cw(c..) or ccw(c..) an arc to the next point about the centre after c; other vN are vias at no path point)
+1V8: C21.1 C35.1 M1.40 NC1.1 R14.2 R15.2 R41.2 | length 50.8
  Top Layer w0.5: v1(161.798,155.829) 161.807,155.838 163.784,155.838 M1.40@163.793,155.846 ; R41.2@171.945,145.688 171.965,145.708 174.161,145.708 C35.1@174.18,145.727 ; C35.1@174.18,145.727 R15.2@176.454,145.726 v1(176.454,147.498) ; v1(183.871,147.498) 183.883,147.485 183.883,145.708 R14.2@183.896,145.695 183.903,145.702 186.137,145.702 C21.1@186.144,145.708 186.144,147.688 186.887,148.431 NC1.1@186.887,150.52
  Bottom Layer w0.5: v1(161.798,155.829) 160.401,155.829 159.995,155.423 159.995,148.247 160.744,147.498 v1(176.454,147.498) v1(183.871,147.498)
+3.3V_1: C76.1 C77.1 C78.1 L7.2 U9.2 | length 14.6
  Top Layer w0.8: L7.2@96.99,167.615 97.012,167.592 97.012,166.306 ; C78.1@97.073,161.277 97.067,161.284 97.067,163.366 C76.1@97.06,163.373 97.048,163.386 97.048,165.519 C77.1@97.035,165.532 97.035,166.306 U9.2@105.283,166.306
+3V3: +3V3.0 C14.1 C36.1 C43.1 C44.1 C45.1 C46.1 C47.1 C48.1 C49.1 C50.1 C55.1 C56.1 C57.1 C58.1 C59.1 C60.1 C64.1 C66.1 C67.1 C70.1 C71.1 C72.1 C75.1 C79.1 C80.1 C81.1 C82.1 C83.1 C84.1 C85.1 C86.1 EC3.1 IC2.2 J2.7 J2.14 J3.1 JP1.2 L7.1 P1.11 P1.13 R6.2 R8.2 R9.2 R11.2 R21.1 R22.1 R23.1 R26.2 R30.2 R32.2 R42.2 R51.2 R52.2 R59.2 R60.2 R63.2 R64.2 R65.2 R66.2 R67.2 R68.2 R69.2 R70.2 R71.2 R72.2 R73.2 R74.2 R75.2 R76.2 R77.2 U2.2 U4.4 U4.8 U4.11 U4.15 U4.17 U4.21 U4.28 U6.8 U7.16 U8.16 | length 856.9
  Top Layer w0.2: U4.28@174.231,127.193 178.565,127.193 179.161,127.79 U4.17@179.161,130.123
  Top Layer w0.25: v1(176.809,134.137) 176.809,133.434 177.161,133.082 U4.21@177.161,130.123 ; U4.17@179.161,130.123 179.161,132.679 179.785,133.303 181.578,133.303 181.724,133.45 181.724,135.889 C49.1@181.724,135.896 ; C45.1@179.696,135.892 179.705,135.883 v1(179.705,134.112) ; U4.15@180.161,130.123 180.161,132.028 180.594,132.461 184.963,132.461 185.725,133.223 C50.1@185.725,135.883 ; U4.4@182.591,124.693 184.762,124.693 185.122,124.333 v1(188.722,124.333) ; U4.8@182.591,126.693 186.51,126.693 186.817,127 186.817,128.397 187.198,128.778 v1(188.709,128.778) ; U4.11@182.591,128.193 184.657,128.193 185.166,128.702 185.166,130.962 186.017,131.813 C47.1@191.148,131.813 ; v1(188.722,133.985) 191.001,133.985 191.137,133.849 C48.1@191.141,133.845
  Top Layer w0.3: R22.1@194.615,112.427 R22.1@194.621,112.42
  Top Layer w0.5: C14.1@76.664,152.389 79.868,152.389 U2.2@79.883,152.404 83.202,152.404 85.026,154.229 EC3.1@85.026,160.744 ; C79.1@90.214,167.569 C79.1@90.233,167.588 ; R6.2@92.342,167.64 92.316,167.614 C79.1@90.26,167.614 ; R65.2@94.799,157.048 94.793,157.055 94.793,159.15 R52.2@94.786,159.156 89.649,159.156 88.062,160.744 EC3.1@85.026,160.744 ; L7.1@94.99,167.615 94.977,167.601 90.272,167.601 C79.1@90.26,167.614 ; R69.2@120.761,111.211 R70.2@123.244,111.211 ; U8.16@121.031,134.315 C58.1@121.031,137.89 ; R70.2@123.279,111.176 R71.2@125.87,111.176 ; R71.2@125.832,111.164 R72.2@128.397,111.164 ; R72.2@128.422,111.189 R73.2@130.937,111.189 ; R73.2@130.938,111.19 R74.2@133.452,111.19 ; C80.1@132.207,119.455 C81.1@134.366,119.455 ; R59.2@133.471,166.306 R60.2@133.471,164.147 133.477,164.141 135.223,164.141 v1(135.23,164.135) ; R74.2@133.477,111.189 R75.2@135.992,111.189 R76.2@138.532,111.189 ; R51.2@133.49,157.645 133.496,157.639 135.249,157.639 v1(135.255,157.632) ; IC2.2@134.366,125.012 C81.1@134.366,119.455 ; R77.2@141.072,111.176 R76.2@138.544,111.176 R76.2@138.532,111.189 ; R77.2@141.116,111.221 C60.1@143.383,111.221 C59.1@145.542,111.221 ; v1(143.751,100.965) 173.863,100.965 ; C59.1@145.573,111.252 v1(147.574,111.252) ; v1@147.601,111.252 148.997,111.252 149.047,111.202 U6.8@149.047,111.175 ; C36.1@162.725,143.293 162.74,143.277 164.869,143.277 R42.2@164.884,143.262 164.884,141.567 165.976,140.475 C43.1@190.545,140.475 ; C85.1@164.886,46.965 C85.1@164.864,46.943 ; J3.1@164.901,35.738 164.864,35.774 164.864,41.072 C85.1@164.864,46.943 ; R32.2@167.957,112.395 R30.2@169.989,112.395 170.005,112.411 R26.2@172.006,112.411 ; R26.2@172.022,112.427 172.034,112.414 v1(172.034,111.255) ; v1(173.863,105.664) 173.863,100.965 ; C45.1@179.696,135.892 181.721,135.892 C49.1@181.724,135.889 ; C49.1@181.724,135.889 183.712,135.889 C46.1@183.718,135.883 C50.1@185.725,135.883 ; R11.2@184.213,112.427 R9.2@186.245,112.427 186.261,112.411 188.262,112.411 188.29,112.382 188.29,111.201 v1(188.303,111.188) ; v1(185.23,105.702) 185.23,98.641 186.498,97.373 C83.1@193.523,97.373 193.544,97.351 C84.1@199.415,97.351 ; 186.441,135.979 188.011,135.979 188.023,135.992 191.103,135.992 C44.1@191.116,135.979 ; C43.1@190.627,140.393 190.627,138.405 191.141,137.891 C44.1@191.141,136.004 ; C48.1@191.137,133.849 C44.1@191.137,136.001 ; C47.1@191.141,131.82 C48.1@191.141,133.845 ; R22.1@194.621,112.42 194.621,111.195 v1(194.627,111.188) ; R21.1@198.641,123.558 198.657,123.542 198.657,121.542 R23.1@198.673,121.526 ; v1(198.657,119.866) R23.1@198.657,121.51 ; C84.1@199.449,97.385 219.38,97.385 J2.7@222.491,97.385 ; R63.2@200.279,37.687 200.291,37.7 202.426,37.7 C67.1@202.438,37.712 202.45,37.7 204.585,37.7 R64.2@204.597,37.687 R68.2@206.756,37.687 206.768,37.7 208.903,37.7 C72.1@208.915,37.712 208.927,37.7 211.062,37.7 R67.2@211.074,37.687 211.086,37.7 213.221,37.7 C71.1@213.233,37.712 ; v1(200.533,86.233) 224.028,86.233 225.031,87.236 J2.14@225.031,89.84 ; C64.1@208.585,60.63 210.464,60.63 211.081,61.246 C66.1@213.691,61.246 ; C66.1@213.716,61.246 C66.1@213.691,61.246 ; JP1.2@226.009,61.265 213.709,61.265 C66.1@213.691,61.246 ; EC3.1@85.026,160.744 85.026,163.728 84.032,164.722 C75.1@84.032,167.576 84.044,167.588 C79.1@90.233,167.588 ; C79.1@90.233,167.588 C79.1@90.26,167.614 ; C81.1@134.366,119.455 C82.1@136.525,119.455 136.556,119.424 138.422,119.424 R66.2@138.454,119.393 138.466,119.38 138.466,117.246 C70.1@138.479,117.234 138.511,117.201 138.511,111.209 R76.2@138.532,111.189 ; C85.1@164.864,46.943 164.864,50.056 165.735,50.927 173.101,50.927 173.863,51.689 173.863,100.965
  Top Layer w1: J3.1@164.901,35.738 164.901,30.806 166.243,29.464 205.867,29.464 206.756,30.353 R68.2@206.756,37.687
  Bottom Layer w0.25: v1(176.809,134.137) 176.822,134.125 179.692,134.125 v1(179.705,134.112)
  Bottom Layer w0.3: v1(188.722,139.065) 224.523,139.065 225.171,138.417 225.171,133.236 ; P1.11@222.339,122.526 224.608,122.526 225.171,123.088 225.171,133.236 ; P1.13@222.339,133.236 225.171,133.236
  Bottom Layer w0.5: v1@87.857,167.589 125.513,167.589 125.806,167.882 125.806,170.789 126.873,171.856 134.087,171.856 135.23,170.713 v1(135.23,164.135) ; v1(89.535,157.734) 89.535,122.555 ; v1(106.807,122.555) 89.535,122.555 ; v1(135.255,157.632) 135.255,164.082 135.249,164.089 135.249,164.103 v1@135.255,164.109 ; v1(147.574,111.252) v1(147.574,110.109) 147.574,102.565 145.961,100.952 143.764,100.952 v1(143.751,100.965) v1(142.621,100.965) 142.615,100.959 141.357,100.959 v1(141.351,100.952) v1(140.081,100.952) 91.821,100.952 89.535,103.238 89.535,122.555 ; v1(172.034,111.255) 172.034,107.087 172.454,106.667 v1(185.217,106.667) 188.337,106.667 ; v1(188.303,111.188) 188.303,109.961 188.337,109.927 188.337,106.667 ; v1(188.722,139.065) v1(188.722,137.922) v1(188.722,136.779) v1(188.722,135.001) v1(188.722,133.985) 188.716,133.979 188.716,128.784 v1(188.709,128.778) 188.709,125.519 188.722,125.506 v1(188.722,124.333) 188.722,121.602 190.459,119.866 v1(198.657,119.866) 204.492,119.866 205.892,118.466 205.892,107.594 204.965,106.667 194.627,106.667 ; v1(194.627,111.188) 194.627,106.667 ; 188.337,106.667 194.627,106.667
  other v1: 204.597,35.204 204.572,36.22 204.483,59.944 204.445,61.151 174.752,105.664 147.574,112.395 106.807,121.666 188.722,132.969 87.844,167.589
+3V9: +3V9.0 C6.1 C10.1 C11.1 C12.1 C13.1 D6.2 D7.1 D9.1 EC1.1 L3.2 L4.2 R4.2 R5.2 | length 239.9
  Top Layer w0.5: R5.2@88.798,105.784 88.773,105.81 86.766,105.81 C6.1@86.741,105.835 86.741,102.997 87.478,102.26 104.788,102.26 106.197,103.67 106.197,114.224 105.648,114.774 L3.2@101.956,114.774 ; C13.1@101.861,131.699 C12.1@101.861,129.54 C11.1@101.861,127.381 C10.1@101.861,125.222 101.861,119.932 EC1.1@101.93,119.863 L3.2@101.93,114.774 ; C13.1@101.873,131.711 R4.2@101.873,133.871 101.876,133.874 101.876,136.484 +3V9.0@101.879,136.487 ; D7.1@206.554,172.073 209.308,172.073 209.88,171.501 v1(209.88,168.288) 209.88,165.075 209.474,164.668 D9.1@206.601,164.668
  Top Layer w0.7: v1(146.558,147.066) 146.558,142.434 146.968,142.024 152.209,142.024 152.871,142.685 D6.2@152.871,143.857 ; D6.2@152.905,143.856 L4.2@156.35,143.856
  Top Layer w1: +3V9.0@101.879,136.487 101.879,140.995 103.886,143.002 124.968,143.002 125.857,143.891 125.857,146.05 126.873,147.066 v1(129.921,147.066) v1(130.81,147.066)
  Bottom Layer w1: 127.412,147.066 v1(128.905,147.066) v1(129.921,147.066) v1(130.81,147.066) v1(145.669,147.066) v1(146.558,147.066) 155.232,147.066 156.883,148.717 156.883,171.107 159.686,173.91 207.941,173.91 209.88,171.971 v1(209.88,168.288)
+5V: +5V.0 C3.1 C4.1 C15.1 C68.1 C69.1 EC2.1 EC6.1 L1.2 R1.2 R55.1 R61.2 R81.2 U1.3 U2.3 U5.7 U5.8 | length 448.2
  Top Layer w0.25: U5.7@207.819,76.035 U5.8@208.319,76.035 208.319,72.808 C69.1@208.331,72.796
  Top Layer w0.5: R1.2@51.778,102.063 51.79,102.076 54.178,102.076 C4.1@54.191,102.088 ; +5V.0@54.28,99.873 54.235,99.917 54.235,102.044 C4.1@54.191,102.088 ; U1.3@71.476,120.98 71.476,116.929 72.288,116.116 75.159,116.116 75.805,115.47 L1.2@75.805,107.645 75.805,102.094 74.449,100.738 C3.1@59.525,100.738 57.364,100.738 56.014,102.088 C4.1@54.191,102.088 ; C15.1@76.69,150.101 79.87,150.101 U2.3@79.883,150.114 79.883,144.786 EC2.1@79.877,144.78 EC2.1@79.813,144.844 ; v1(128.333,170.599) 128.346,170.612 131.108,170.612 R81.2@131.121,170.624 ; EC6.1@193.98,72.816 193.986,72.822 R55.1@199.841,72.822 199.841,69.095 200.914,68.021 208.293,68.021 ; C69.1@208.331,72.796 C68.1@208.331,70.51 ; v1(211.201,70.485) 211.188,70.498 208.343,70.498 C68.1@208.331,70.51 ; R61.2@211.785,66.123 211.785,67.728 211.492,68.021 208.293,68.021 ; 208.293,68.021 208.331,68.059 C68.1@208.331,70.51
  Bottom Layer w0.5: v1(76.898,117.17) 76.905,117.177 76.905,144.837 76.911,144.844 76.911,146.685 76.924,146.698 v1(76.924,147.676) 76.911,147.688 76.911,164.49 78.664,166.243 126.238,166.243 126.911,166.916 126.911,170.04 127.47,170.599 v1(128.333,170.599)
  Bottom Layer w1: v1(76.898,116.18) v1(76.898,115.252) 76.898,90.742 82.042,85.598 152.908,85.598 156.083,82.423 156.083,36.195 160.909,31.369 208.153,31.369 211.201,34.417 v1(211.201,70.485)
  other v1: 211.201,69.469 77.838,116.192 77.838,117.157 76.924,146.685 77.864,146.698 77.864,147.663
+5V_DEBUG: DEBUG1.1 R81.1 | length 5.7
  Top Layer w0.5: R81.1@133.471,170.624 135.23,170.624 136.309,169.545 DEBUG1.1@138.684,169.545
+12V: +12V.0 C1.1 C2.1 C7.1 C8.1 C9.1 C38.1 C39.1 C42.1 C51.1 C52.1 C53.1 IC1.3 K1.A1 K2.A1 K3.A1 K4.A1 K5.A1 PS1.4 R2.2 R3.1 R45.2 R49.2 R50.2 R53.2 R54.2 R62.2 U1.1 U3.9 | length 726.1
  Top Layer w0.3: v1(87.846,103.873) 90.487,103.873 90.856,104.242 90.856,105.765 R3.1@90.843,105.778 R3.1@90.862,105.797 ; R62.2@213.906,66.161 R62.2@213.944,66.123
  Top Layer w0.5: C38.1@37.569,93.082 37.569,90.56 R45.2@37.56,90.551 37.56,86.671 35.774,84.885 K1.A1@35.774,80.01 35.774,76.392 37.668,74.498 64.379,74.498 ; C38.1@37.578,93.091 37.578,97.37 40.945,100.736 44.361,100.736 45.854,102.229 C51.1@45.854,107.645 45.854,137.382 49.217,140.746 60.243,140.746 ; 60.255,130.975 60.243,130.962 ; +12V.0@62.116,128.321 60.395,128.321 60.243,128.168 ; C42.1@66.287,92.964 66.275,92.952 66.275,90.69 R49.2@66.262,90.678 66.262,88.068 64.379,86.185 K2.A1@64.379,80.097 64.379,74.498 ; U1.1@68.936,120.98 65.354,120.98 C2.1@65.316,120.942 60.757,120.942 C1.1@60.401,120.587 60.243,120.745 60.243,128.168 ; IC1.3@89.845,113.532 C8.1@89.845,116.84 89.884,116.878 C9.1@89.884,119.774 83.969,119.774 ; R50.2@94.918,90.597 C39.1@94.918,92.837 ; R50.2@94.964,90.551 94.964,87.7 92.827,85.563 K3.A1@92.827,80.097 92.827,74.641 92.685,74.498 ; U3.9@108.839,114.226 108.839,102.819 107.01,100.99 85.369,100.99 83.969,102.391 83.969,119.774 ; C52.1@123.488,92.837 123.475,92.825 123.475,90.563 R53.2@123.463,90.551 123.463,87.395 121.275,85.207 K4.A1@121.275,80.097 121.275,74.59 121.183,74.498 ; C53.1@151.497,92.989 151.488,92.98 151.488,90.712 R54.2@151.479,90.703 151.479,88.157 149.723,86.401 K5.A1@149.723,80.224 149.723,76.088 148.133,74.498 121.183,74.498 ; 60.243,128.168 60.243,130.962 ; 60.243,130.962 60.243,140.746 ; 60.243,140.746 PS1.4@68.612,140.746 81.936,140.746 83.969,138.713 C7.1@83.969,127.127 83.969,119.774 ; 64.379,74.498 92.685,74.498 ; 92.685,74.498 121.183,74.498
  Top Layer w1: R62.2@213.906,66.161 v1(213.906,67.653)
  Bottom Layer w0.3: v1(82.74,116.827) 82.74,105.067 83.934,103.873 v1(87.846,103.873)
  Bottom Layer w1: PS1.4@68.612,140.746 68.612,86.963 72.136,83.439 151.765,83.439 153.797,81.407 153.797,34.417 159.258,28.956 210.185,28.956 213.906,32.677 v1(213.906,67.653)
A0_IN: R72.1 SD1.4B U8.1 | length 28.7
  Top Layer w0.3: v1(121.031,122.555) U8.1@121.031,124.765
  Top Layer w0.5: SD1.4B@128.397,105.664 128.403,105.67 128.403,108.82 R72.1@128.41,108.826
  Bottom Layer w0.3: v1(121.031,122.555) 121.031,113.868 121.818,113.081 127.533,113.081 128.397,112.217 SD1.4B@128.397,105.664
A0_OUT: R69.1 SD1.1B U7.1 | length 33.2
  Top Layer w0.5: v1(108.839,122.492) U7.1@108.839,124.714 ; R69.1@120.752,108.852 120.764,108.839 120.764,105.677 SD1.1B@120.777,105.664
  Bottom Layer w0.3: v1(108.839,122.492) 108.839,110.541 109.83,109.55 120.091,109.55 120.777,108.864 SD1.1B@120.777,105.664
A0_ROM: R77.1 SD1.9B U6.1 | length 14.7
  Top Layer w0.3: R77.1@141.084,108.839 R77.1@141.091,108.833 ; SD1.9B@141.091,105.67 SD1.9B@141.097,105.664 140.97,105.537 140.97,104.102 141.427,103.645 148.539,103.645 149.047,104.153 U6.1@149.047,105.575
  Top Layer w0.5: SD1.9B@141.091,105.67 R77.1@141.091,108.833
A1_IN: R73.1 SD1.5B U8.2 | length 30.1
  Top Layer w0.3: v1(122.301,122.555) U8.2@122.301,124.765
  Top Layer w0.5: SD1.5B@130.937,105.664 R73.1@130.937,108.839
  Bottom Layer w0.3: v1(122.301,122.555) 122.301,115.113 123.114,114.3 130.342,114.3 130.937,113.705 SD1.5B@130.937,105.664
A1_OUT: R70.1 SD1.2B U7.2 | length 34.6
  Top Layer w0.5: v1(110.109,122.479) U7.2@110.109,124.714 ; R70.1@123.279,108.826 123.298,108.807 123.298,105.683 SD1.2B@123.317,105.664
  Bottom Layer w0.3: v1(110.109,122.479) 110.109,111.785 111.125,110.769 122.911,110.769 123.317,110.363 SD1.2B@123.317,105.664
A1_ROM: R76.1 SD1.8B U6.2 | length 19.2
  Top Layer w0.3: R76.1@138.544,108.826 R76.1@138.551,108.82 ; SD1.8B@138.551,105.67 SD1.8B@138.557,105.664 138.557,103.873 139.433,102.997 149.542,102.997 150.317,103.772 U6.2@150.317,105.575
  Top Layer w0.5: SD1.8B@138.551,105.67 R76.1@138.551,108.82
A2_IN: R74.1 SD1.6B U8.3 | length 31.4
  Top Layer w0.3: v1(123.571,122.555) U8.3@123.571,124.765
  Top Layer w0.5: R74.1@133.452,108.814 133.464,108.801 133.464,105.677 SD1.6B@133.477,105.664
  Bottom Layer w0.3: v1(123.571,122.555) 123.571,116.002 124.13,115.443 132.659,115.443 133.477,114.625 SD1.6B@133.477,105.664
A2_OUT: R71.1 SD1.3B U7.3 | length 35.8
  Top Layer w0.5: U7.3@111.379,124.714 111.385,124.708 111.385,122.498 v1(111.392,122.492) ; R71.1@125.832,108.814 125.844,108.801 125.844,105.677 SD1.3B@125.857,105.664
  Bottom Layer w0.3: v1(111.392,122.492) 111.392,112.789 112.268,111.912 125.273,111.912 125.857,111.328 SD1.3B@125.857,105.664
A2_ROM: R75.1 SD1.7B U6.3 | length 24.2
  Top Layer w0.3: R75.1@135.992,108.839 R75.1@136.004,108.826 ; SD1.7B@136.004,105.677 SD1.7B@136.017,105.664 136.017,103.238 136.893,102.362 150.673,102.362 151.587,103.276 U6.3@151.587,105.575
  Top Layer w0.5: SD1.7B@136.004,105.677 R75.1@136.004,108.826
ACTLED: R28.2 U4.27 | length 42.1
  Top Layer w0.2: U4.27@174.231,127.693 176.188,127.693 176.371,127.876 176.504,127.876 v1(176.581,127.953)
  Top Layer w0.3: R28.2@198.78,112.414 198.819,112.376 200.92,112.376 v1(200.977,112.433)